# Altium PCB 汽车空调控制器-540V-ADP32F036QP48Q.pcbdoc (part 1 of 2)
Units mm, origin at the board's own origin, x right, y up, seen from the top; angles counter-clockwise.
Board outline 106.25 x 93.7 mm, 2 copper layers (Top Layer, Bottom Layer); 167 components, 106 nets, 476 pads, 259 vias.
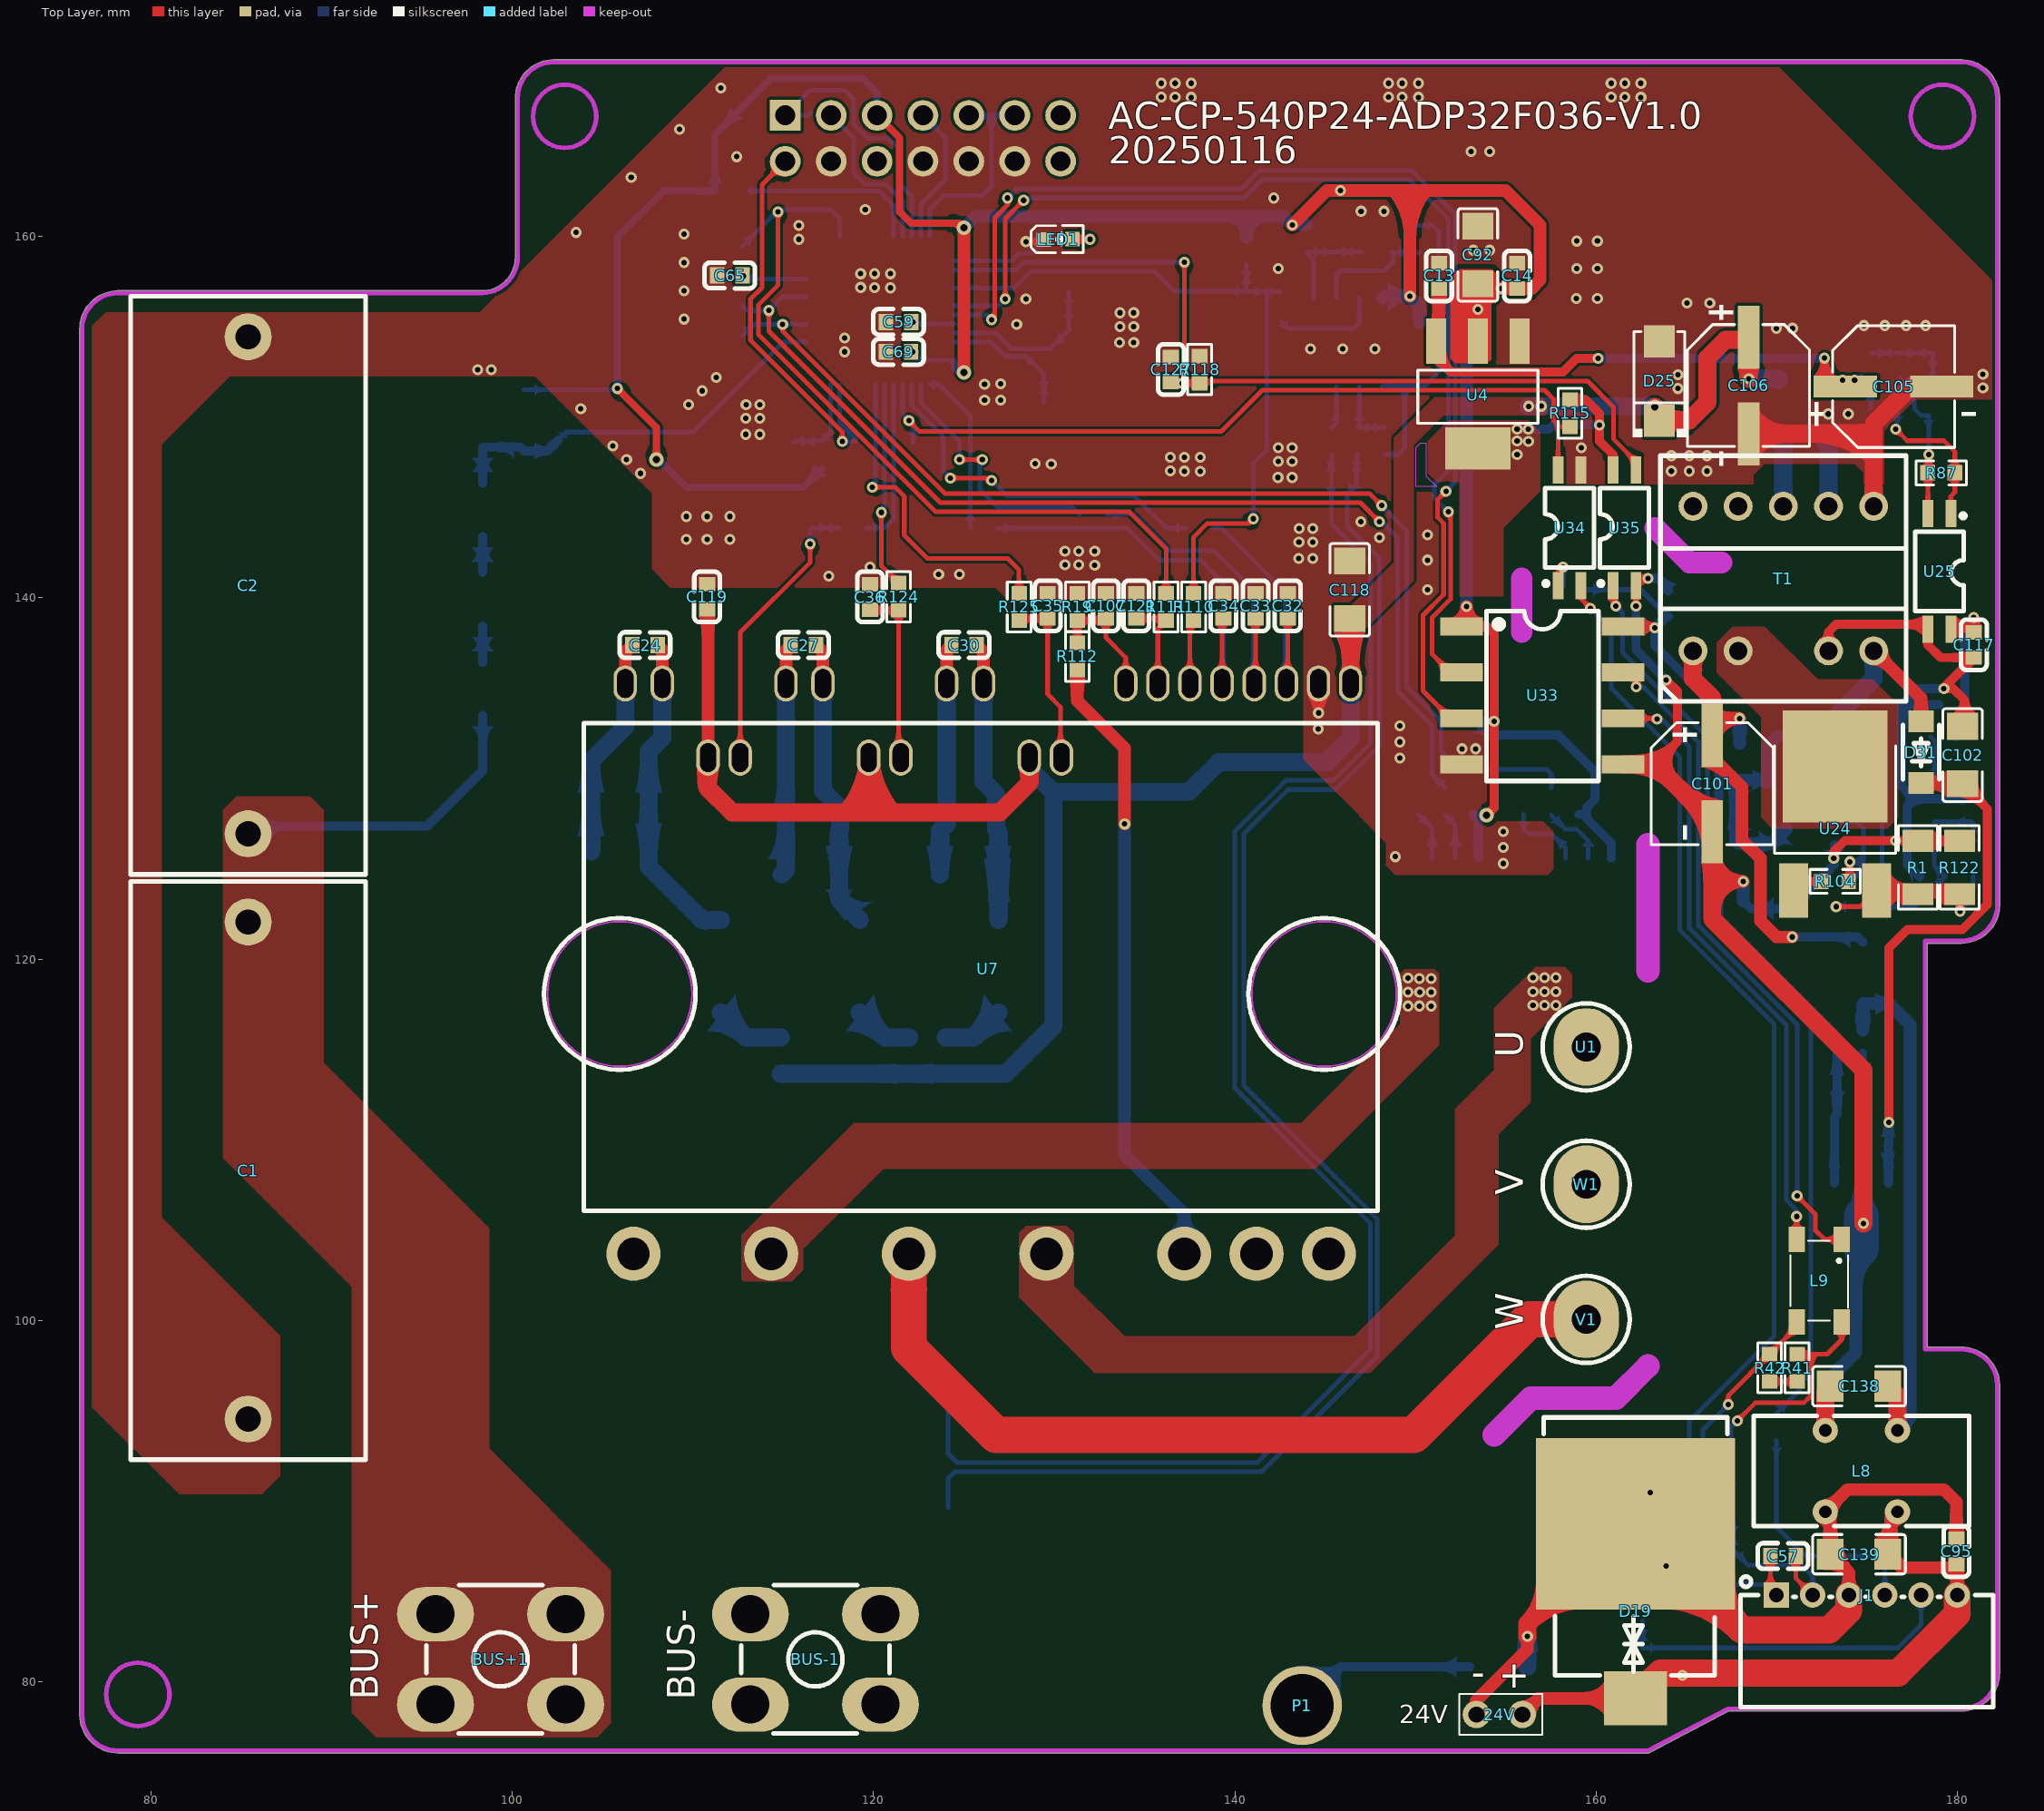
[diagram p0: Top Layer view]
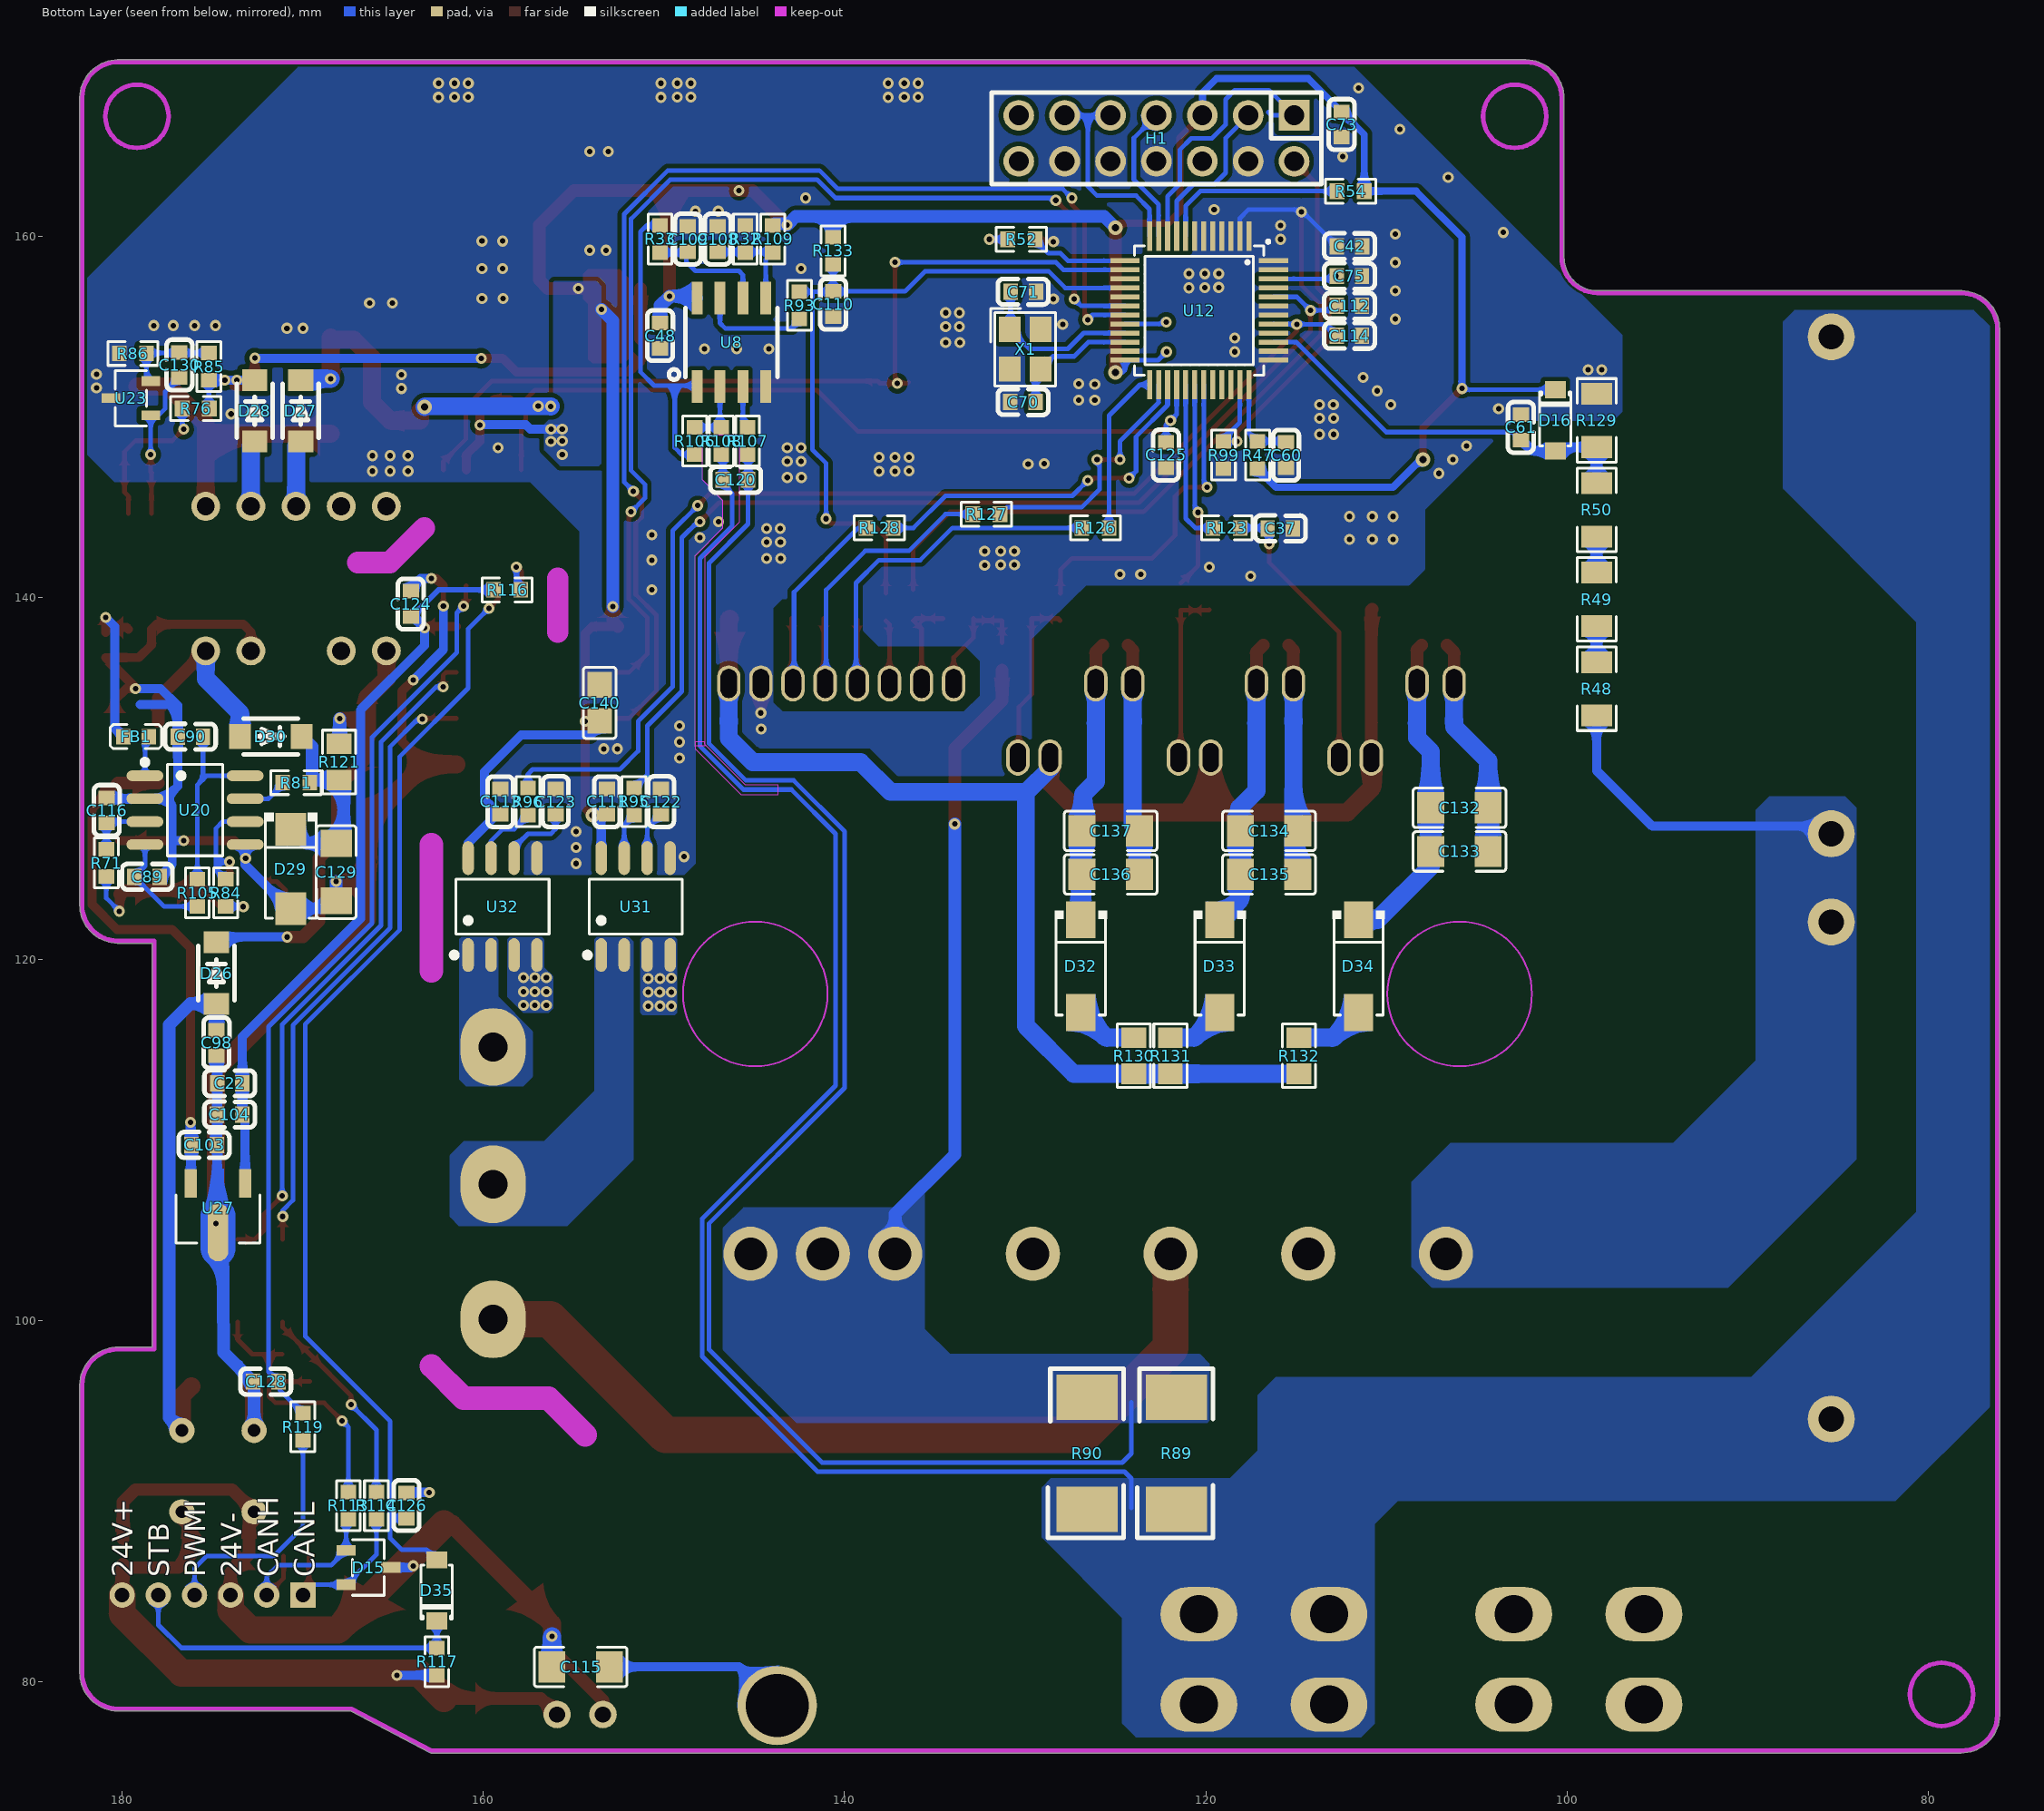
[diagram p1: Bottom Layer view, seen from below]

## Layer stack, top to bottom
Top Solder Mask Layer: solder mask 0.0102, Solder Resist, Dk 3.5
Top Layer: signal copper 0.0356
Dielectric1: dielectric 0.32, FR-4, Dk 4.8
Bottom Layer: signal copper 0.0356
Bottom Solder Mask Layer: solder mask 0.0102, Solder Resist, Dk 3.5

## Board outline
76.073,78.166 76.073,154.851 cw(c76.2,154.86) 76.073,154.86 cw(c78.2,154.86) 78.164,156.987 cw(c78.166,156.86) 78.182,156.986 cw(c78.2,156.86) 78.2,156.987 98.31,156.987 cw(c98.31,156.86) 98.326,156.986 cw(c98.344,156.86) 98.342,156.988 ccw(c98.31,158.86) 100.183,158.86 cw(c100.31,158.86) 100.183,158.86 100.184,167.617 cw(c100.312,167.617) 100.184,167.622 cw(c100.31,167.643) 100.183,167.643 cw(c102.31,167.643) 102.274,169.77 cw(c102.276,169.643) 102.292,169.769 cw(c102.31,169.643) 102.31,169.77 180.22,169.77 cw(c180.22,169.643) 180.226,169.77 cw(c180.2,167.643) 182.327,167.679 cw(c182.2,167.677) 182.327,167.677 cw(c182.2,167.677) 182.326,167.661 cw(c182.2,167.643) 182.327,167.643 182.327,123.01 cw(c180.2,123.01) 180.236,120.883 cw(c180.234,121.01) 180.218,120.884 cw(c180.2,121.01) 180.2,120.883 178.327,120.883 178.327,98.537 180.2,98.537 cw(c180.2,96.41) 182.327,96.446 cw(c182.2,96.444) 182.327,96.444 cw(c182.2,96.444) 182.326,96.428 cw(c182.2,96.41) 182.327,96.41 182.327,80.52 cw(c180.2,80.52) 180.236,78.393 cw(c180.234,78.52) 180.218,78.394 cw(c180.2,78.52) 180.2,78.393 167.341,78.393 162.949,76.087 cw(c162.89,76.2) 162.89,76.073 131.72,76.073 cw(c131.72,76.2) 131.711,76.073 78.209,76.073 cw(c78.2,76.2) 78.2,76.073 cw(c78.2,78.2) 76.073,78.164 cw(c76.2,78.166)

## Design rules (kind name [scope] priority, off if disabled: settings)
Clearance copperThickness1oz [All] p1: gap=0.152 ignorepadtopadclearanceinfootprint=FALSE except(0.102: Track-Track; 0.178: Arc-Arc Arc-Track Arc-SMDPad Arc-THPad Arc-Via Arc-Fill Arc-Poly Arc-Region Arc-Text Arc-Hole; 0.3: Track-Region Poly-Region)
Clearance copperThickness2oz [All] p2: gap=0.152 ignorepadtopadclearanceinfootprint=FALSE except(0.178: Arc-Arc Arc-Track Arc-SMDPad Arc-THPad Arc-Via Arc-Fill Arc-Poly Arc-Region Arc-Text Arc-Hole; 0.203: Track-Track; 0.3: Track-Region Poly-Region)
DiffPairsRouting differentialPair [All] p1: maxlimit=0.152 minlimit=0.152 mostfreqgap=0.152 toplayer_minwidth=0.127 toplayer_maxwidth=2.54 toplayer_prefwidth=0.254 bottomlayer_minwidth=0.127 bottomlayer_maxwidth=2.54 bottomlayer_prefwidth=0.254 maxuncoupledlength=0.254
PasteMaskExpansion pasteMaskExpansion [All] p1: expansion=0
PlaneConnect innerPlane [All] p1: planeconnectstyle=Relief reliefexpansion=0.508 reliefentries=4 reliefconductorwidth=0.254 reliefairgap=0.254
PolygonConnect copperRegion [All] p1: connectstyle=Direct reliefconductorwidth=0.254 reliefentries=4 polygonreliefangle="90 Angle" airgapwidth=0.254
RoutingVias viaSize [All] p1: holewidth=0.305 width=0.61 viastyle="Through Hole" minholewidth=0.3 minwidth=0.5 maxholewidth=6.3 maxwidth=10
SolderMaskExpansion solderMaskExpansion [All] p1: expansion=0.051 useseparateexpansions=TRUE expansionbottom=0.051
Width copperThickness1oz_1 [All] p1: maxlimit=2.54 minlimit=0.127 preferedwidth=0.254
Width copperThickness2oz_1 [All] p2: maxlimit=2.54 minlimit=0.203 preferedwidth=0.254
27 further rules are at their usual default settings.

## Components (designator, comment, footprint, x,y, rotation, side; value= is the part's Value field where it differs from the comment)
24V "PZ254V-11-02P" jp2 155.91,78.203 r180 top
BUS+1 "T34001" CONN-TH_T34001 99.363,81.254 r90 top
BUS-1 "T34001" CONN-TH_T34001 116.788,81.254 r90 top
C1 "C3D3A205KB00C00" CAP-TH_L32.0-W13.0-P27.50-D0.8 85.393,108.305 r90 top
C2 "C3D3A205KB00C00" CAP-TH_L32.0-W13.0-P27.50-D0.8 85.393,140.69 r270 top
C13 "0603B104K500NT" C0603 151.303,157.815 r90 top
C14 "0603B104K500NT" C0603 155.621,157.815 r90 top
C22 "0603B105K250NT" C0603 174.024,113.131 r180 bottom
C24 "0603B104K500NT" C0603 107.364,137.378 r0 top
C27 "0603B104K500NT" C0603 116.127,137.378 r0 top
C30 "0603B104K500NT" C0603 125.017,137.378 r0 top
C32 "CC0603KRX7R9BB101" C0603 142.924,139.547 r270 top
C33 "CC0603KRX7R9BB101" C0603 141.146,139.547 r270 top
C34 "CC0603KRX7R9BB101" C0603 139.368,139.547 r270 top
C35 "CC0603KRX7R9BB101" C0603 129.639,139.547 r270 top
C36 "CC0603KRX7R9BB101" C0603 119.81,140.04 r270 top
C37 "CC0603KRX7R9BB101" C0603 115.885,143.841 r0 bottom
C42 "0603B104K500NT" C0603 112.047,159.453 r180 bottom
C48 "0603B104K500NT" C0603 150.212,154.5 r270 bottom
C57 "CC0603KRX7R9BB101" C0603 170.339,86.969 r0 top
C59 "0603B225K250NT" C0603 121.397,155.262 r0 top
C60 "0603B104K500NT" C0603 115.564,147.896 r90 bottom
C61 "0603B104K500NT" C0603 102.571,149.435 r90 bottom
C65 "0603B105K250NT" C0603 112.054,157.83 r0 top
C69 "0603B225K250NT" C0603 121.381,153.611 r180 top
C70 "CC0603JRNPO9BN120" C0603 130.125,150.832 r0 bottom
C71 "CC0603JRNPO9BN120" C0603 130.109,156.928 r180 bottom
C73 "0603B104K500NT" C0603 112.493,166.188 r270 bottom
C75 "0603B104K500NT" C0603 112.063,157.802 r0 bottom
C89 "CC0603KRX7R9BB102" C0603 178.603,124.561 r0 bottom
C90 "0603B104K500NT" C0603 176.206,132.313 r0 bottom
C92 "1206B106K250NT" C1206 153.45,158.975 r270 top
C95 "0603B104K500NT" C0603 179.933,87.223 r90 top
C98 "0603B104K500NT" C0603 174.761,115.368 r270 bottom
C101 "RVE100UF35V67RV0072" CAP-SMD_BD6.3-L6.6-W6.6-LS7.6-FD-1 166.419,129.713 r270 top
C102 "1206B106K250NT" C1206 180.272,131.292 r270 top
C103 "0603B104K500NT" C0603 175.436,109.72 r180 bottom
C104 "0603B104K500NT" C0603 174.039,111.404 r0 bottom
C105 "RVE100UF35V67RV0072" CAP-SMD_BD6.3-L6.6-W6.6-LS7.6-FD-1 176.452,151.687 r0 top
C106 "RVE100UF35V67RV0072" CAP-SMD_BD6.3-L6.6-W6.6-LS7.6-FD-1 168.43,151.739 r270 top
C107 "CC0603KRX7R9BB102" C0603 132.861,139.547 r270 top
C108 "0603B104K500NT" C0603 147.021,159.842 r270 bottom
C109 "CC0603KRX7R9BB102" C0603 148.672,159.842 r270 bottom
C110 "CC0603KRX7R9BB102" C0603 140.629,156.252 r90 bottom
C111 "0603B104K500NT" C0603 153.145,128.719 r90 bottom
C112 "CC0603KRX7R9BB102" C0603 112.063,156.151 r0 bottom
C113 "0603B104K500NT" C0603 159.044,128.719 r90 bottom
C114 "CC0603KRX7R9BB102" C0603 112.063,154.5 r0 bottom
C115 "1206B103K202NT" C1206 154.605,80.835 r180 bottom
C116 "0603B472K500NT" C0603 180.835,128.229 r270 bottom
C117 "CC0603JRNPO9BN101" C0603 180.897,137.388 r270 top
C118 "1206B106K500NT" C1206 146.353,140.436 r270 top
C119 "0603B104K500NT" C0603 110.793,140.055 r90 top
C120 "CC0603KRX7R9BB102" C0603 146.037,146.529 r0 bottom
C121 "CC0603KRX7R9BB102" C0603 134.542,139.547 r270 top
C122 "CC0603KRX7R9BB102" C0603 150.154,128.711 r270 bottom
C123 "CC0603KRX7R9BB102" C0603 155.996,128.711 r270 bottom
C124 "0603B104K500NT" C0603 164.003,139.656 r90 bottom
C125 "CC0603KRX7R9BB102" C0603 122.209,147.903 r90 bottom
C126 "CC0603KRX7R9BB102" C0603 164.248,89.76 r270 bottom
C127 "CC0603KRX7R9BB103" C0603 136.462,152.628 r270 top
C128 "CC0603KRX7R9BB102" C0603 172.025,96.621 r180 bottom
C129 "1206B106K250NT" C1206 168.129,124.815 r90 bottom
C130 "CC0603KRX7R9BB103" C0603 176.813,152.882 r270 bottom
C132 "1206B106K250NT" C1206 105.967,128.371 r180 bottom
C133 "1206B106K250NT" C1206 105.967,125.958 r180 bottom
C134 "1206B106K250NT" C1206 116.508,127.101 r180 bottom
C135 "1206B106K250NT" C1206 116.508,124.688 r180 bottom
C136 "1206B106K250NT" C1206 125.271,124.688 r180 bottom
C137 "1206B106K250NT" C1206 125.271,127.101 r180 bottom
C138 "1206B106K250NT" C1206 174.547,96.361 r0 top
C139 "1206B106K250NT" C1206 174.547,87.07 r0 top
C140 "CL21B106KOQNNNE" C0805 153.553,134.182 r270 bottom
D15 "PESD1CAN_C907838" SOT-23-3_L2.9-W1.6-P1.90-LS2.8-BR 166.347,86.334 r0 bottom
D16 "1N4148W_C2099" SOD-123_L2.8-W1.8-LS3.7-RD 100.666,149.816 r270 bottom
D19 "SM8S33CA_C314434" DO-218AB_L13.5-W8.4-LS15.5-BI 162.172,83.921 r270 top
D25 "1SMA4746A_C173483" SMA_L4.4-W2.6-LS5.0-RD 163.498,151.993 r90 top
D26 "DSS210_C511868" SOD-123_L2.8-W1.8-LS3.7-FD 174.76,119.227 r90 bottom
D27 "DSS210_C511868" SOD-123_L2.8-W1.8-LS3.7-FD 170.102,150.342 r90 bottom
D28 "DSS210_C511868" SOD-123_L2.8-W1.8-LS3.7-FD 172.642,150.342 r90 bottom
D29 "1SMA4746A_C173483" SMA_L4.4-W2.6-LS5.0-RD 170.65,124.986 r270 bottom
D30 "DSS210_C511868" SOD-123_L2.8-W1.8-LS3.7-FD 171.753,132.323 r180 bottom
D31 "DSS210_C511868" SOD-123_L2.8-W1.8-LS3.7-FD 177.976,131.452 r270 top
D32 "US1M_C412437" SMA_L4.4-W2.8-LS5.4-RD 126.922,119.608 r270 bottom
D33 "US1M_C412437" SMA_L4.4-W2.8-LS5.4-RD 119.238,119.608 r270 bottom
D34 "US1M_C412437" SMA_L4.4-W2.8-LS5.4-RD 111.555,119.608 r270 bottom
D35 "1N4148W_C2099" SOD-123_L2.8-W1.8-LS3.7-RD 162.571,85.064 r90 bottom
FB1 "BLM18PG121SN1D" L0603 179.21,132.308 r180 bottom
H1 "PZ254V-12-14P" HDR-TH_14P-P2.54-V-M-R2-C7-S2.54 122.739,165.422 r0 bottom
J1 "IPCW200W16NW01R" CONN-TH_6P-P2.00_INCP_IPCW200W16XWXXR 169.975,84.81 r0 top
L8 "PDMCAT953-102MLN" IND-TH_4P-L12.0-W6.0_PDMCAT953-501MLN 174.674,91.668 r0 top
L9 "ACT45B-510-2P-TL003" IND-SMD_4P-L4.5-W3.2-TL 172.339,102.209 r270 top
LED1 "NCD0603R1_C84263" LED0603-RD_RED 130.215,159.834 r0 top
P1 "PAD-ED" hole-3.5 143.726,78.7 r0 top
R1 "CRCW12061R00FKEAHP" R1206 177.796,125.069 r270 top
R19 "0603WAF4701T5E" R0603 131.282,139.491 r270 top
R32 "0603WAF2001T5E" R0603 145.497,159.849 r270 bottom
R33 "0603WAF2001T5E" R0603 150.209,159.849 r270 bottom
R41 "0603WAF1002T5E" R0603 171.118,97.383 r270 top
R42 "0603WAF1002T5E" R0603 169.594,97.383 r270 top
R47 "0603WAF1002T5E" R0603 117.143,147.896 r270 bottom
R48 "RC1206FR-07270KL" R1206 98.38,134.957 r270 bottom
R49 "RC1206FR-07270KL" R1206 98.38,139.91 r270 bottom
R50 "RC1206FR-07270KL" R1206 98.38,144.863 r270 bottom
R52 "RC0603FR-071KL" R0603 130.215,159.834 r0 bottom
R54 "0603WAF1002T5E" R0603 111.991,162.501 r180 bottom
R71 "0603WAF1001T5E" R0603 180.857,125.323 r270 bottom
R76 "0603WAF3300T5E" R0603 175.906,150.469 r180 bottom
R81 "0603WAF0000T5E" R0603 170.356,129.768 r180 bottom
R84 "0603WAF1002T5E" R0603 174.252,123.672 r270 bottom
R85 "0603WAF3001T5E" R0603 175.182,152.793 r270 bottom
R86 "0603WAF2001T5E" R0603 179.385,153.517 r180 bottom
R87 "0603WAF2001T5E" R0603 179.095,146.913 r180 top
R89 "LR2512D-3W-20mR-1%" RES-SMD_L6.4-W3.2-1 121.634,92.653 r270 bottom
R90 "LR2512D-3W-20mR-1%" RES-SMD_L6.4-W3.2-1 126.579,92.653 r270 bottom
R93 "0603WAF1001T5E" R0603 142.499,156.181 r270 bottom
R95 "0603WAF1001T5E" R0603 151.649,128.719 r270 bottom
R96 "0603WAF1001T5E" R0603 157.52,128.711 r270 bottom
R99 "0603WAF2201T5E" R0603 119.028,147.896 r90 bottom
R104 "0603WAF220JT5E" R0603 173.218,124.304 r180 top
R105 "0603WAF1002T5E" R0603 175.817,123.672 r90 bottom
R106 "0603WAF4701T5E" R0603 148.291,148.673 r270 bottom
R107 "0603WAF1001T5E" R0603 145.37,148.673 r270 bottom
R108 "0603WAF1001T5E" R0603 146.817,148.673 r270 bottom
R109 "0603WAF4701T5E" R0603 143.973,159.849 r90 bottom
R110 "0603WAF220JT5E" R0603 137.717,139.491 r270 top
R111 "0603WAF220JT5E" R0603 136.193,139.491 r270 top
R112 "0603WAF2001T5E" R0603 131.282,136.753 r270 top
R113 "0603WAF220JT5E" R0603 167.461,89.76 r270 bottom
R114 "0603WAF220JT5E" R0603 165.908,89.763 r270 bottom
R115 "0603WAF2001T5E" R0603 158.545,150.212 r90 top
R116 "0603WAF3300T5E" R0603 158.672,140.436 r0 bottom
R117 "0603WAF1002T5E" R0603 162.561,81.127 r90 bottom
R118 "RC0603FR-071KL" R0603 138.048,152.628 r270 top
R119 "RC0603FR-071KL" R0603 169.975,94.124 r270 bottom
R121 "TC0525D4991T5E" R0805 167.973,130.911 r90 bottom
R122 "CRCW12061R00FKEAHP" R1206 180.106,125.069 r270 top
R123 "0603WAF220JT5E" R0603 118.847,143.862 r180 bottom
R124 "0603WAF220JT5E" R0603 121.389,140.055 r270 top
R125 "0603WAF220JT5E" R0603 128.065,139.491 r270 top
R126 "0603WAF220JT5E" R0603 126.116,143.862 r0 bottom
R127 "0603WAF220JT5E" R0603 132.149,144.624 r0 bottom
R128 "0603WAF220JT5E" R0603 138.071,143.862 r0 bottom
R129 "1206W4F3001T5E" R1206 98.38,149.816 r270 bottom
R130 "0805W8F470KT5E" R0805 124.001,114.655 r90 bottom
R131 "0805W8F470KT5E" R0805 121.969,114.655 r90 bottom
R132 "0805W8F470KT5E" R0805 114.861,114.655 r90 bottom
R133 "0603WAF1002T5E" R0603 140.632,159.199 r90 bottom
T1 "高频变压器-8pin" ? 170.356,141.06 r90 top
U1 "PAD-4.5MM" HOLE-1.6 159.446,115.145 r90 top
U4 "AMS1117-3.3_C6186" SOT-223-3_L6.5-W3.4-P2.30-LS7.0-BR 153.45,151.231 r90 top
U7 "FSBB15CH120D" SPM-27-RA 125.96,119.48 r0 top locked
U8 "TSV912IDT" SO-8_L4.9-W3.9-P1.27-LS6.0-BL 146.26,154.134 r180 bottom
U12 "ADP32F036QP48S" LQFP-48_L7.0-W7.0-P0.50-LS9.0-BL_1 120.369,155.897 r0 bottom
U20 "UCC28C41D" SOIC-8_L4.9-W3.9-P1.27-LS6.0-BL 175.944,128.244 r270 bottom
U23 "TL431ACDBZR" SOT-23-3_L3.0-W1.7-P0.95-LS2.9-BR 179.5,151.04 r180 bottom
U24 "IRFR3910_C5350891" TO-252-2_L6.6-W6.1-P4.57-LS9.9-BR-CW 173.218,127.228 r270 top
U25 "EL3H7(C)(TA)-G" SMD-4_L2.7-W4.4-P1.27-LS7.0-BL 178.992,141.452 r180 top
U27 "CJ78L05_C2079" SOT-89-3_L4.5-W2.5-P1.50-LS4.2-BR 174.674,106.246 r90 bottom
U31 "CC6904SO-30A" SOP-8_L4.9-W3.9-P1.27-LS6.0-BL 151.56,122.91 r180 bottom
U32 "CC6904SO-30A" SOP-8_L4.9-W3.9-P1.27-LS6.0-BL 158.926,122.91 r180 bottom
U33 "ISO1050DUBR" SOIC-8_L9.3-W6.6-P2.54-LS10.4-BL 157.021,134.594 r270 top
U34 "EL3H7(C)(TA)-G" SMD-4_L2.7-W4.4-P1.27-LS7.0-BL 158.523,143.865 r0 top
U35 "EL3H7(C)(TA)-G" SMD-4_L2.7-W4.4-P1.27-LS7.0-BL 161.564,143.865 r0 top
V1 "PAD-4.5MM" HOLE-1.6 159.446,100.067 r90 top
W1 "PAD-4.5MM" HOLE-1.6 159.446,107.542 r90 top
X1 "XXDBBCNANF-20.000000MHZ" CRYSTAL-SMD_4P-L3.2-W2.5-BL 130.003,153.753 r270 bottom

## Footprints (in the part's own frame and the unit in brackets; to place one, negate y for a bottom-side part, rotate by r counter-clockwise, add the part's x,y. Pads: shape width x height; smd on the part's side, far side on the other; paste and mask are expansions set on the pad)
C0603 [mm]
  rect 0.8x0.9 smd: 1(-0.7,0) 2(0.7,0)
  silkscreen extent -1.41,-0.71 1.39,0.72
C0805 [mm]
  rect 1.41x1.35 smd paste-100 mask+0.051: 1(-1,0) 2(1,0)
  silkscreen extent -1.96,-0.9 1.96,0.9
C1206 [mm]
  rect 1.485x1.728 smd paste-100 mask+0.051: 1(-1.593,0) 2(1.593,0)
  silkscreen extent -2.56,-1.09 2.56,1.09
CAP-SMD_BD6.3-L6.6-W6.6-LS7.6-FD-1 [mm]
  rect 3.5x1.2 smd: 1(-2.67,0) 2(2.67,0)
  silkscreen extent -3.38,-3.38 3.38,3.38
CAP-TH_L32.0-W13.0-P27.50-D0.8 [mm]
  round 2.6 hole 1.4: 1(-13.75,0) 2(13.75,0)
  silkscreen extent -16,-6.5 16,6.5
CONN-TH_6P-P2.00_INCP_IPCW200W16XWXXR [mm]
  rect 1.4x1.4 hole 0.8 paste+0 mask+0.05: 1(0,0)
  round 1.4 hole 0.8 paste+0 mask+0.05: 2(2,0) 3(4,0) 4(6,0) 5(8,0) 6(10,0)
  silkscreen extent -2,-6.2 12,1.02
CONN-TH_T34001 [mm]
  oval 3x4.25 hole 2.1: 1(-2.5,-3.6) 2(2.5,-3.6) 3(2.5,3.6) 4(-2.5,3.6)
  silkscreen extent -4.1,-4.1 4.1,4.1
CRYSTAL-SMD_4P-L3.2-W2.5-BL [mm]
  rect 1.4x1.2 smd: 1(-1.1,-0.85) 2(1.1,-0.85) 3(1.1,0.85) 4(-1.1,0.85)
  silkscreen extent -2.26,-1.91 2.03,1.68
DO-218AB_L13.5-W8.4-LS15.5-BI [mm]
  rect 9.5x11 smd: 1(-4.825,0)
  rect 3x3.5 smd: 2(4.825,0)
  silkscreen extent -10.72,-5.08 3.54,5.08
HDR-TH_14P-P2.54-V-M-R2-C7-S2.54 [mm]
  rect 1.7x1.7 hole 1.1: 1(-7.62,-1.27)
  round 1.7 hole 1.1: 2(-7.62,1.27) 3(-5.08,-1.27) 4(-5.08,1.27) 5(-2.54,-1.27) 6(-2.54,1.27) 7(0,-1.27) 8(0,1.27) 9(2.54,-1.27) 10(2.54,1.27) 11(5.08,-1.27) 12(5.08,1.27) 13(7.62,-1.27) 14(7.62,1.27)
  silkscreen extent -9.12,-2.54 9.12,2.54
HOLE-1.6 [mm]
  oval 4.3x3.6 hole 1.6: 1(0,0)
  silkscreen extent -2.41,-2.41 2.41,2.41
hole-3.5 [mm]
  round 4.4 hole 3.5: 1(0,0)
IND-SMD_4P-L4.5-W3.2-TL [mm]
  rect 1.4x0.9 smd: 1(-2.28,1.25) 2(-2.28,-1.25) 3(2.28,-1.25) 4(2.28,1.25)
  silkscreen extent -2.2,-1.6 2.2,1.6
IND-TH_4P-L12.0-W6.0_PDMCAT953-501MLN [mm]
  round 1.4 hole 0.7: 1(-2,-2.25) 2(-2,2.25) 3(2,2.25) 4(2,-2.25)
  silkscreen extent -5.97,-3.05 5.97,3.05
jp2 [mil]
  round 60 hole 35 paste+0 mask+4: 1(0,0) 2(100,0)
  silkscreen extent -44,-45 138,44
L0603 [mm]
  rect 0.8x0.864 smd paste-100 mask+0.051: 1(-0.7,0) 2(0.7,0)
  silkscreen extent -1.42,-0.65 1.41,0.67
LED0603-RD_RED [mm]
  rect 0.8x0.8 smd: 1(-0.8,-0.003) 2(0.8,0.003)
  silkscreen extent -1.49,-0.75 1.39,0.76
LQFP-48_L7.0-W7.0-P0.50-LS9.0-BL_1 [mm]
  rect 0.28x1.62 smd: 1(-2.75,-4.11) 2(-2.25,-4.11) 3(-1.75,-4.11) 4(-1.25,-4.11) 5(-0.75,-4.11) 6(-0.25,-4.11) 7(0.25,-4.11) 8(0.75,-4.11) 9(1.25,-4.11) 10(1.75,-4.11) 11(2.25,-4.11) 12(2.75,-4.11) 25(2.75,4.11) 26(2.25,4.11) 27(1.75,4.11) 28(1.25,4.11) 29(0.75,4.11) 30(0.25,4.11) 31(-0.25,4.11) 32(-0.75,4.11) 33(-1.25,4.11) 34(-1.75,4.11) 35(-2.25,4.11) 36(-2.75,4.11)
  rect 1.62x0.28 smd: 13(4.11,-2.75) 14(4.11,-2.25) 15(4.11,-1.75) 16(4.11,-1.25) 17(4.11,-0.75) 18(4.11,-0.25) 19(4.11,0.25) 20(4.11,0.75) 21(4.11,1.25) 22(4.11,1.75) 23(4.11,2.25) 24(4.11,2.75) 37(-4.11,2.75) 38(-4.11,2.25) 39(-4.11,1.75) 40(-4.11,1.25) 41(-4.11,0.75) 42(-4.11,0.25) 43(-4.11,-0.25) 44(-4.11,-0.75) 45(-4.11,-1.25) 46(-4.11,-1.75) 47(-4.11,-2.25) 48(-4.11,-2.75)
  silkscreen extent -3.9,-3.9 3.58,3.58
R0603 [mm]
  rect 0.806x0.864 smd paste-100 mask+0.051: 1(-0.753,0) 2(0.753,0)
  silkscreen extent -1.39,-0.66 1.39,0.66
R0805 [mm]
  rect 1.133x1.377 smd paste-100 mask+0.051: 1(-1,0) 2(1,0)
  silkscreen extent -1.76,-0.92 1.76,0.92
R1206 [mm]
  rect 1.208x1.701 smd paste-100 mask+0.051: 1(-1.479,0) 2(1.479,0)
  silkscreen extent -2.31,-1.08 2.31,1.08
RES-SMD_L6.4-W3.2-1 [mm]
  rect 2.5x3.4 smd: 1(-3.1,0) 2(3.1,0)
  silkscreen extent -4.69,-2.16 4.69,2.03
SMA_L4.4-W2.6-LS5.0-RD [mm]
  rect 1.8x1.7 smd: 1(-2.192,0) 2(2.192,0)
  silkscreen extent -3.11,-1.48 2.73,1.48
SMA_L4.4-W2.8-LS5.4-RD [mm]
  rect 2.046x1.62 smd: 1(-2.565,0) 2(2.565,0)
  silkscreen extent -3.08,-1.44 2.7,1.44
SMD-4_L2.7-W4.4-P1.27-LS7.0-BL [mm]
  rect 0.6x1.5 smd: 1(-0.635,-3.2) 2(0.635,-3.2) 3(0.635,3.2) 4(-0.635,3.2)
  silkscreen extent -1.44,-3.21 1.35,2.2
SO-8_L4.9-W3.9-P1.27-LS6.0-BL [mm]
  rect 0.6x1.8 smd paste+0 mask+0.05: 1(-1.905,-2.45) 2(-0.635,-2.45) 3(0.635,-2.45) 4(1.905,-2.45) 5(1.905,2.45) 6(0.635,2.45) 7(-0.635,2.45) 8(-1.905,2.45)
  silkscreen extent -3.46,-2.06 2.54,1.91
SOD-123_L2.8-W1.8-LS3.7-FD [mm]
  rect 1.2x1.4 smd: 1(-1.7,0) 2(1.7,0)
  silkscreen extent -1.5,-1 1.5,1
SOD-123_L2.8-W1.8-LS3.7-RD [mm]
  rect 0.95x1.15 smd: 1(-1.692,0) 2(1.692,0)
  silkscreen extent -1.58,-0.87 1.41,0.87
SOIC-8_L4.9-W3.9-P1.27-LS6.0-BL [mm]
  oval 0.588x2.045 smd: 1(-1.905,-2.772) 2(-0.635,-2.772) 3(0.635,-2.772) 4(1.905,-2.772) 5(1.905,2.772) 6(0.635,2.772) 7(-0.635,2.772) 8(-1.905,2.772)
  silkscreen extent -2.8,-2.92 2.53,1.52
SOIC-8_L9.3-W6.6-P2.54-LS10.4-BL [mm]
  rect 1x2.35 smd: 1(-3.81,-4.471) 2(-1.27,-4.471) 3(1.27,-4.471) 4(3.81,-4.471) 5(3.81,4.471) 6(1.27,4.471) 7(-1.27,4.471) 8(-3.81,4.471)
  silkscreen extent -4.67,-3.1 4.73,3.1
SOP-8_L4.9-W3.9-P1.27-LS6.0-BL [mm]
  oval 0.63x1.865 smd: 1(-1.905,-2.682) 2(-0.635,-2.682) 3(0.635,-2.682) 4(1.905,-2.682) 5(1.905,2.682) 6(0.635,2.682) 7(-0.635,2.682) 8(-1.905,2.682)
  silkscreen extent -2.82,-2.83 2.58,1.52
SOT-23-3_L2.9-W1.6-P1.90-LS2.8-BR [mm]
  rect 1.07x0.6 smd: 1(1.235,-0.95) 2(1.235,0.95) 3(-1.235,0)
  silkscreen extent -0.88,-1.54 0.88,1.54
SOT-23-3_L3.0-W1.7-P0.95-LS2.9-BR [mm]
  rect 1.037x0.532 smd: 1(1.101,-0.95) 2(1.101,0.95) 3(-1.101,0)
  silkscreen extent -0.86,-1.53 0.86,1.53
SOT-89-3_L4.5-W2.5-P1.50-LS4.2-BR [mm]
  rect 1.575x0.672 smd: 1(1.356,-1.5) 3(1.356,1.5)
  oval 3.226x1.14 smd: 2(-1.356,0)
  Top Layer region: -2.283,0.95 -0.429,0.95 -0.384,0.949 -0.34,0.946 -0.296,0.94 -0.252,0.933 -0.208,0.924 -0.165,0.912 -0.123,0.899 -0.081,0.884 -0.04,0.866 0,0.847 0.04,0.826 0.078,0.803 0.115,0.779 0.151,0.752 0.185,0.724 0.219,0.695 0.251,0.664 0.281,0.631 0.31,0.597 0.337,0.562 0.362,0.525 0.386,0.488 0.408,0.449 0.428,0.409 0.447,0.33 2.144,0.33 2.144,-0.33 0.447,-0.33 0.428,-0.409 0.408,-0.449 0.386,-0.488 0.362,-0.526 0.337,-0.562 0.31,-0.597 0.281,-0.631 0.251,-0.664 0.219,-0.695 0.185,-0.725 0.151,-0.753 0.115,-0.779 0.078,-0.804 0.04,-0.827 0,-0.848 -0.04,-0.867 -0.081,-0.884 -0.123,-0.899 -0.165,-0.913 -0.208,-0.924 -0.252,-0.934 -0.296,-0.941 -0.34,-0.946 -0.384,-0.949 -0.429,-0.95 -2.283,-0.95 -2.328,-0.949 -2.372,-0.946 -2.416,-0.941 -2.46,-0.934 -2.504,-0.924 -2.547,-0.913 -2.589,-0.899 -2.631,-0.884 -2.672,-0.867 -2.713,-0.848 -2.752,-0.827 -2.79,-0.804 -2.827,-0.779 -2.863,-0.753 -2.898,-0.725 -2.931,-0.695 -2.963,-0.664 -2.993,-0.631 -3.022,-0.597 -3.049,-0.562 -3.075,-0.526 -3.098,-0.488 -3.12,-0.449 -3.141,-0.409 -3.159,-0.369 -3.175,-0.327 -3.189,-0.285 -3.202,-0.242 -3.212,-0.199 -3.22,-0.155 -3.227,-0.111 -3.231,-0.067 -3.233,-0.022 -3.233,0.022 -3.231,0.067 -3.227,0.111 -3.22,0.155 -3.212,0.199 -3.202,0.242 -3.189,0.285 -3.175,0.327 -3.159,0.369 -3.141,0.409 -3.12,0.449 -3.098,0.488 -3.075,0.525 -3.049,0.562 -3.022,0.597 -2.993,0.631 -2.963,0.664 -2.931,0.695 -2.898,0.724 -2.863,0.752 -2.827,0.779 -2.79,0.803 -2.752,0.826 -2.713,0.847 -2.672,0.866 -2.631,0.884 -2.589,0.899 -2.547,0.912 -2.504,0.924 -2.46,0.933 -2.416,0.94 -2.372,0.946 -2.328,0.949
  silkscreen extent -1.95,-2.33 0.7,2.33
SOT-223-3_L6.5-W3.4-P2.30-LS7.0-BR [mm]
  rect 2.5x1.1 smd: 1(2.97,-2.3) 2(2.97,0) 3(2.97,2.3)
  rect 2.34x3.6 smd: 4(-2.97,0)
  silkscreen extent -1.57,-3.33 1.37,3.33
SPM-27-RA [mm]
  oval 1.3x2 hole 0.9 slot 1.6 at 90 deg: 1(20.447,15.776) 2(18.669,15.776) 3(16.891,15.776) 4(15.113,15.776) 5(13.335,15.776) 6(11.557,15.776) 7(9.779,15.776) 8(8.001,15.776) 9(4.445,11.676) 10(2.667,11.676) 11(0.136,15.776) 12(-1.914,15.776) 13(-4.445,11.676) 14(-6.223,11.676) 15(-8.754,15.776) 16(-10.804,15.776) 17(-13.335,11.676) 18(-15.113,11.676) 19(-17.644,15.776) 20(-19.694,15.776)
  round 3 hole 1.8: 21(19.24,-15.784) 22(15.24,-15.784) 23(11.24,-15.784) 24(3.62,-15.784) 25(-4,-15.784) 26(-11.62,-15.784) 27(-19.24,-15.784)
  Board Outline Layer circle w0.1: c-20,-1.404 r4
  Board Outline Layer circle w0.1: c-20,-1.404 r4
  Board Outline Layer circle w0.1: c18.984,-1.404 r4
  Board Outline Layer circle w0.1: c18.984,-1.404 r4
  silkscreen extent -21.99,-13.41 21.95,13.58
TO-252-2_L6.6-W6.1-P4.57-LS9.9-BR-CW [mm]
  rect 3x1.6 smd: 1(3.424,-2.29) 3(3.424,2.29)
  rect 6.2x5.8 smd: 2(-3.424,0)
  silkscreen extent -4.58,-3.35 1.38,3.35
? [mm]
  round 1.6 hole 1: 1(-4,5) 2(-4,2.5) 4(-4,-2.5) 5(-4,-5) 6(4,-5) 7(4,-2.5) 8(4,0) 9(4,2.5) 10(4,5)
  silkscreen extent -6.8,-6.8 6.8,6.8

## Via types
v1: diameter 0.61, hole 0.305, Top Layer to Bottom Layer, 254 vias
v2: diameter 0.8, hole 0.4, Top Layer to Bottom Layer, 5 vias

## Nets (pads, with @x,y where several pads share a name; then routed paths per layer and width w, separated by ;. In a path a pad name is that pad's centre, name@x,y a point inside that pad or via, vN(x,y) a via of type N, cw(c..) or ccw(c..) an arc to the next point about the centre after c; other vN are vias at no path point)
$1N11682: D28.1 T1.7 | length 3.7
  Bottom Layer w1: D28.1@172.642,148.642 172.856,148.428 T1.7@172.856,145.06
$1N12547: C116.2 R71.1 U20.3 | length 3.6
  Bottom Layer w0.254: U20.3@178.716,127.609 180.755,127.609 C116.2@180.835,127.529 180.857,127.507 R71.1@180.857,126.076
$1N14862: C115.2 P1.1 | length 10.2
  Bottom Layer w0.5: P1.1@143.697,78.7 145.831,80.835 C115.2@153.012,80.835
$1N16095: R81.1 U20.7 | length 2.6
  Bottom Layer w0.254: R81.1@170.982,129.768 171.871,128.879 U20.7@173.172,128.879
$1N16797: T1.2 U24.2
$1N19948: D27.1 T1.8 | length 3.7
  Bottom Layer w1: D27.1@170.102,148.642 170.356,148.388 T1.8@170.356,145.06
$1N21848: R104.2 U24.1 | length 1.7
  Top Layer w0.254: U24.1@170.928,123.804 171.428,124.304 R104.2@172.465,124.304
$1N22072: FB1.2 U20.1 | length 2.2
  Bottom Layer w0.254: FB1.2@178.51,132.308 178.716,132.101 U20.1@178.716,130.149
$1N22075: C117.1 FB1.1 U25.4 | length 9.1
  Top Layer w0.5: U25.4@179.627,138.252 179.726,138.351 C117.1@180.894,138.351 ; v1(180.894,138.909) C117.1@180.894,138.351 ; C117.1@180.897,138.088 180.894,138.091 C117.1@180.894,138.351
  Bottom Layer w0.5: FB1.1@179.909,132.308 180.394,132.792 180.394,138.409 v1(180.894,138.909)
$1N22199: C89.2 R105.1 U20.4 | length 6.2
  Bottom Layer w0.254: R105.1@175.817,122.919 177.661,122.919 C89.2@179.303,124.561 178.716,125.148 U20.4@178.716,126.339
$1N22206: C90.1 R105.2 U20.8 | length 10.4
  Bottom Layer w0.254: U20.8@173.172,130.149 173.175,130.146 175.306,130.146 175.506,129.946 ; 175.506,129.934 175.506,129.946 ; C90.1@175.506,132.313 175.506,129.946 ; R105.2@175.817,124.425 175.817,129.635 175.506,129.946
$1N22512: D30.1 D31.1 T1.5 | length 10.5
  Top Layer w0.7: T1.5@175.356,137.06 177.976,134.44 D31.1@177.976,133.152
  Bottom Layer w1: D30.1@173.453,132.323 173.453,133.627 175.356,135.53 T1.5@175.356,137.06
$1N22523: C102.2 C103.1 D31.2 U27.3 | length 29.1
  Top Layer w0.5: v1(176.195,110.969) 176.195,120.621 177.211,121.637 180.259,121.637 181.65,123.028 181.65,128.321 C102.2@180.272,129.699
  Top Layer w0.7: D31.2@177.976,129.752 180.219,129.752 C102.2@180.272,129.699
  Bottom Layer w0.5: U27.3@176.174,107.602 176.174,109.681 C103.1@176.136,109.72 176.195,109.778 v1(176.195,110.969)
$1N23186: R76.1 R87.1 U25.1 | length 8.5
  Top Layer w0.254: v1(176.576,149.323) 177.211,148.688 179.243,148.688 179.848,148.083 R87.1@179.848,146.913 179.848,145.84 179.627,145.619 U25.1@179.627,144.652
  Bottom Layer w0.254: v1(176.576,149.323) 176.66,149.407 R76.1@176.66,150.469
$1N23217: C130.2 R87.2 U23.1 U25.2 | length 8.5
  Top Layer w0.254: U25.2@178.357,144.652 178.357,146.897 R87.2@178.341,146.913 178.399,146.97 v1(178.399,147.926)
  Bottom Layer w0.254: C130.2@176.813,152.182 177.592,151.403 177.592,150.466 177.968,150.09 U23.1@178.399,150.09 v1(178.399,147.926)
$1N23222: C130.1 R85.1 R86.2 U23.2 | length 5.1
  Bottom Layer w0.254: R85.1@175.182,153.546 178.603,153.546 R86.2@178.632,153.517 178.632,152.223 U23.2@178.399,151.99
$1N23492: C98.1 C138.2 D26.1 L8.3 | length 30
  Top Layer w1: C138.2@176.14,96.361 176.674,95.827 L8.3@176.674,93.918
  Bottom Layer w0.7: C98.1@174.76,116.07 D26.1@174.76,117.527 174.776,117.543 176.189,117.543 177.374,116.358 177.374,94.618 L8.3@176.674,93.918
$1N23574: R84.1 R104.1 U20.6 | length 6.7
  Top Layer w0.254: R104.1@173.971,124.304 174.036,124.368 v1(174.036,125.388)
  Bottom Layer w0.254: U20.6@173.172,127.609 174.414,127.609 174.798,127.225 174.798,125.388 ; v1(174.036,125.388) 174.798,125.388 ; R84.1@174.252,124.425 174.798,124.971 174.798,125.388
$1N23585: R1.2 R71.2 R84.2 R122.2 U24.3 | length 11.4
  Top Layer w0.254: v1(173.274,122.907) 174.611,122.907 U24.3@175.508,123.804
  Top Layer w0.5: R122.2@180.106,123.59 180.132,123.565 v1(180.132,122.653)
  Top Layer w0.7: U24.3@175.508,123.804 179.893,123.804 R122.2@180.106,123.59
  Bottom Layer w0.254: v1(173.274,122.907) 173.285,122.919 R84.2@174.252,122.919 ; v1(180.132,122.653) 180.857,123.378 R71.2@180.857,124.57
$2N1283: C24.1 C132.2 C133.2 U7.20 | length 12.4
  Top Layer w0.7: U7.20@106.266,135.26 106.266,136.98 C24.1@106.664,137.378
  Bottom Layer w1: C133.2@104.374,125.958 C132.2@104.374,128.371 104.374,130.97 106.266,132.861 U7.20@106.266,135.26
$2N1454: C27.1 C134.2 C135.2 U7.16 | length 12.9
  Top Layer w0.7: U7.16@115.156,135.26 115.156,137.107 C27.1@115.427,137.378
  Bottom Layer w1: C135.2@114.915,124.688 115.156,124.929 U7.16@115.156,135.26
$2N1678: C24.2 C132.1 C133.1 D34.1 U7.19 | length 17.9
  Top Layer w0.7: C24.2@108.064,137.378 108.316,137.126 U7.19@108.316,135.26
  Bottom Layer w1: U7.19@108.316,135.26 108.316,132.244 107.56,131.488 C132.1@107.56,128.371 107.56,125.121 110.507,122.173 D34.1@111.555,122.173
$2N2210: C30.1 C136.2 C137.2 U7.12 | length 13
  Top Layer w0.7: U7.12@124.046,135.26 124.046,137.107 C30.1@124.317,137.378
  Bottom Layer w1: C136.2@123.678,124.688 C137.2@123.678,127.101 124.046,127.469 U7.12@124.046,135.26
$2N2237: C30.2 C136.1 C137.1 D32.1 U7.11 | length 15.7
  Top Layer w0.7: C30.2@125.717,137.378 126.096,136.999 U7.11@126.096,135.26
  Bottom Layer w1: U7.11@126.096,135.26 126.096,129.826 126.792,129.13 126.792,127.173 C137.1@126.864,127.101 126.922,127.043 D32.1@126.922,122.173
$2N2591: C32.2 R128.2 U7.3 | length 14.1
  Top Layer w0.254: U7.3@142.851,135.26 142.924,135.333 C32.2@142.924,138.847
  Bottom Layer w0.254: R128.2@138.824,143.862 139.238,143.862 142.794,140.306 142.794,135.317 U7.3@142.851,135.26
$2N2599: C33.2 R127.2 U7.4 | length 18.7
  Top Layer w0.254: U7.4@141.073,135.26 141.146,135.333 C33.2@141.146,138.847
  Bottom Layer w0.254: R127.2@132.903,144.624 134.412,144.624 136.444,142.592 138.857,142.592 141.016,140.433 141.016,135.317 U7.4@141.073,135.26
$2N2614: C34.2 R126.2 U7.5 | length 23
  Top Layer w0.254: U7.5@139.295,135.26 139.295,138.774 C34.2@139.368,138.847
  Bottom Layer w0.254: R126.2@126.869,143.862 134.031,143.862 135.809,142.084 138.095,142.084 139.365,140.814 139.365,135.329 U7.5@139.295,135.26
$2N2629: C35.2 R125.2 U7.9 | length 9.6
  Top Layer w0.254: R125.2@128.065,138.738 128.174,138.847 C35.2@129.639,138.847 129.639,134.665 130.348,133.956 130.348,131.217 U7.9@130.405,131.16
$2N2640: C36.2 R124.2 U7.13 | length 9.8
  Top Layer w0.254: C36.2@119.81,139.34 119.848,139.302 R124.2@121.389,139.302 121.389,131.285 U7.13@121.515,131.16
$2N2647: C37.2 R123.2 U7.17 | length 15.8
  Top Layer w0.254: U7.17@112.625,131.16 112.625,138.077 116.505,141.957 v1(116.505,142.973)
  Bottom Layer w0.254: v1(116.505,142.973) 116.505,143.76 C37.2@116.585,143.841 116.607,143.862 R123.2@118.093,143.862
$2N6987: R48.1 R49.2 | length 2
  Bottom Layer w0.5: R48.1@98.38,136.436 R49.2@98.38,138.432
$2N9394: C107.2 R19.2 R112.1 U7.8 | length 6.9
  Top Layer w0.254: R112.1@131.282,137.506 R19.2@131.282,138.738 132.752,138.738 C107.2@132.861,138.847 132.861,137.793 133.961,136.693 U7.8@133.961,135.26
$2N9718: R49.1 R50.2 | length 2
  Bottom Layer w0.5: R49.1@98.38,141.389 R50.2@98.38,143.385
$2N10633: C108.2 R32.2 R109.1 U8.5 | length 5.7
  Bottom Layer w0.254: U8.5@144.355,156.585 144.355,158.714 R109.1@143.973,159.096 144.019,159.142 C108.2@147.021,159.142
$2N10695: R107.1 U8.3 | length 2.4
  Bottom Layer w0.254: R107.1@145.37,149.427 145.625,149.682 U8.3@145.625,151.684
$2N10698: R106.1 R108.1 U8.2 | length 3.8
  Bottom Layer w0.254: U8.2@146.895,151.684 146.895,149.504 R108.1@146.817,149.427 R106.1@148.291,149.427
$2N10777: C109.2 R33.2 U8.6 | length 6.8
  Bottom Layer w0.254: U8.6@145.625,156.585 145.625,157.869 145.842,158.086 148.255,158.086 148.763,158.594 148.763,159.051 C109.2@148.718,159.096 ; C109.2@148.672,159.142 C109.2@148.718,159.096 ; R33.2@150.209,159.096 C109.2@148.718,159.096
$2N11041: R110.2 U7.6 | length 3.6
  Top Layer w0.254: U7.6@137.517,135.26 137.517,138.538 R110.2@137.717,138.738
$2N11391: R95.2 U31.7 | length 2.6
  Bottom Layer w0.254: R95.2@151.649,127.965 152.195,127.419 U31.7@152.195,125.593
$2N11655: R96.2 U32.7 | length 3.6
  Bottom Layer w0.254: R96.2@157.52,127.958 158.283,127.195 158.917,127.195 159.561,126.551 U32.7@159.561,125.593
$2N12472: R33.1 R106.2 U8.1 | length 17.2
  Bottom Layer w0.254: U8.1@148.165,151.684 148.217,151.736 149.398,151.736 ; R106.2@148.291,147.92 149.011,147.92 149.398,148.307 149.398,151.736 ; R33.1@150.209,160.603 150.945,160.603 151.303,160.245 151.303,152.498 150.541,151.736 149.398,151.736
$2N12504: R93.2 U8.7 | length 6
  Bottom Layer w0.254: R93.2@142.576,155.261 142.926,154.911 146.604,154.911 146.895,155.202 U8.7@146.895,156.585
$2N12793: C121.2 R111.2 U7.7 | length 5.4
  Top Layer w0.254: C121.2@134.542,138.847 136.084,138.847 R111.2@136.193,138.738 135.739,138.284 U7.7@135.739,135.26
$2N13718: C27.2 C134.1 C135.1 D33.1 U7.15 | length 16.2
  Top Layer w0.7: C27.2@116.827,137.378 117.206,136.999 U7.15@117.206,135.26
  Bottom Layer w1: U7.15@117.206,135.26 117.206,129.318 118.156,128.368 118.156,127.156 C134.1@118.101,127.101 C135.1@118.101,124.688 118.101,123.311 D33.1@119.238,122.173
$2N13849: D32.2 R130.2 | length 3.5
  Bottom Layer w1: R130.2@124.001,115.655 125.534,115.655 D32.2@126.922,117.043
$2N13930: D33.2 R131.2 | length 3.3
  Bottom Layer w1: D33.2@119.238,117.043 120.626,115.655 R131.2@121.969,115.655
$2N13933: D34.2 R132.2 | length 3.9
  Bottom Layer w1: D34.2@111.555,117.043 112.943,115.655 R132.2@114.861,115.655
$2N32461: C122.2 U31.6 | length 2.7
  Bottom Layer w0.254: C122.2@150.154,128.011 150.925,127.24 U31.6@150.925,125.593
$2N32465: C123.2 U32.6 | length 4.1
  Bottom Layer w0.254: C123.2@155.996,128.011 155.996,127.195 156.25,126.941 157.52,126.941 158.291,126.17 U32.6@158.291,125.593
$3N2497: L9.1 U33.7 | length 37.5
  Top Layer w0.254: U33.7@161.492,135.864 162.059,135.864 162.219,135.704 v1(162.219,135.069) ; v1(171.115,106.905) 172.131,105.889 172.131,105 172.642,104.489 L9.1@173.589,104.489
  Bottom Layer w0.254: v1(162.219,135.069) 162.6,135.069 165.648,132.021 165.648,121.861 171.115,116.394 v1(171.115,106.905)
$3N2504: L9.2 U33.6 | length 34
  Top Layer w0.254: U33.6@161.492,133.324 163.329,133.324 v1(163.362,133.291) ; L9.2@171.089,104.489 v1(171.089,105.762)
  Bottom Layer w0.254: v1(163.362,133.291) 163.616,133.291 165.14,131.767 165.14,121.734 170.53,116.343 170.53,106.663 171.089,106.104 v1(171.089,105.762)
$3N2535: R41.2 R42.2 | length 1.5
  Top Layer w0.254: R42.2@169.594,96.63 R41.2@171.118,96.63
$3N2628: L9.4 R41.1 R113.1 | length 14.8
  Top Layer w0.254: v1(167.813,94.459) 168.798,95.445 171.49,95.445 171.853,95.808 171.853,98.136 ; R41.1@171.118,98.136 171.853,98.136 ; L9.4@173.589,99.929 173.589,98.941 172.785,98.136 171.853,98.136
  Bottom Layer w0.254: R113.1@167.461,90.513 167.461,94.108 v1(167.813,94.459)
$3N2637: L9.3 R42.1 R114.1 | length 11.6
  Top Layer w0.254: v1(167.305,95.348) 167.305,95.847 R42.1@169.594,98.136 171.089,99.631 L9.3@171.089,99.929
  Bottom Layer w0.254: R114.1@165.908,90.516 165.908,93.951 v1(167.305,95.348)
$3N3456: R116.1 U34.1 | length 2.5
  Top Layer w0.3: U34.1@157.888,140.665 157.888,141.43 v1(158.161,141.703)
  Bottom Layer w0.3: R116.1@157.919,140.436 158.161,140.678 v1(158.161,141.703)
$3N3465: C126.2 D35.2 U34.2 | length 63
  Top Layer w0.254: U34.2@159.158,140.665 159.158,139.944 v1(159.685,139.417)
  Bottom Layer w0.254: v1(159.685,139.417) 160.828,138.274 160.828,134.999 164.632,131.194 164.632,121.607 169.839,116.4 169.839,99.128 165.14,94.429 165.14,89.055 ; D35.2@162.571,86.756 163.131,87.317 164.505,87.317 165.14,87.952 165.14,89.055 ; C126.2@164.248,89.06 165.135,89.06 165.14,89.055
$3N3838: C128.2 R119.1 U35.1 | length 51.2
  Top Layer w0.254: U35.1@160.929,140.665 160.955,140.639 160.955,139.544 v1(161.082,139.544)
  Bottom Layer w0.254: v1(161.082,139.544) 161.463,139.163 161.463,136.968 166.156,132.275 166.156,121.988 171.877,116.267 171.877,97.173 C128.2@171.325,96.621 171.245,96.541 171.245,96.148 R119.1@169.975,94.878
$4N557: C59.2 U12.20 | length 2.3
  Bottom Layer w0.254: v1(122.197,155.262) 122.312,155.147 U12.20@124.479,155.147
$4N1655: LED1.2 R52.2 | length 2
  Top Layer w0.254: LED1.2@131.015,159.837 131.99,159.837 v1(131.993,159.834)
  Bottom Layer w0.254: R52.2@130.968,159.834 v1(131.993,159.834)
$4N1939: C70.1 U12.22 X1.3 | length 7.2
  Bottom Layer w0.254: U12.22@124.479,154.147 126.504,154.147 127.294,153.357 128.449,153.357 X1.3@129.153,152.653 129.425,152.381 C70.1@129.425,150.832